# Altium PCB PCB_14layers_1mm73.PcbDoc (part 4 of 4)
Units mm, origin at the board's own origin, x right, y up, seen from the top; angles counter-clockwise.
Board outline 66 x 50 mm, 14 copper layers (Top Layer, Int1 (GND), Int2 (PWR), Int3 (Sign), GND, Int4 (Sign), Int5 (GND), Int6 (PWR), Int7 (Sign), GND2, Int8 (Sign), Int9 (PWR), Int10 (GND), Bottom Layer), stack 1.644 mm thick; 436 components, 541 nets, 2990 pads, 78 vias.
Unrouted connection lines stored in the file: 1647.
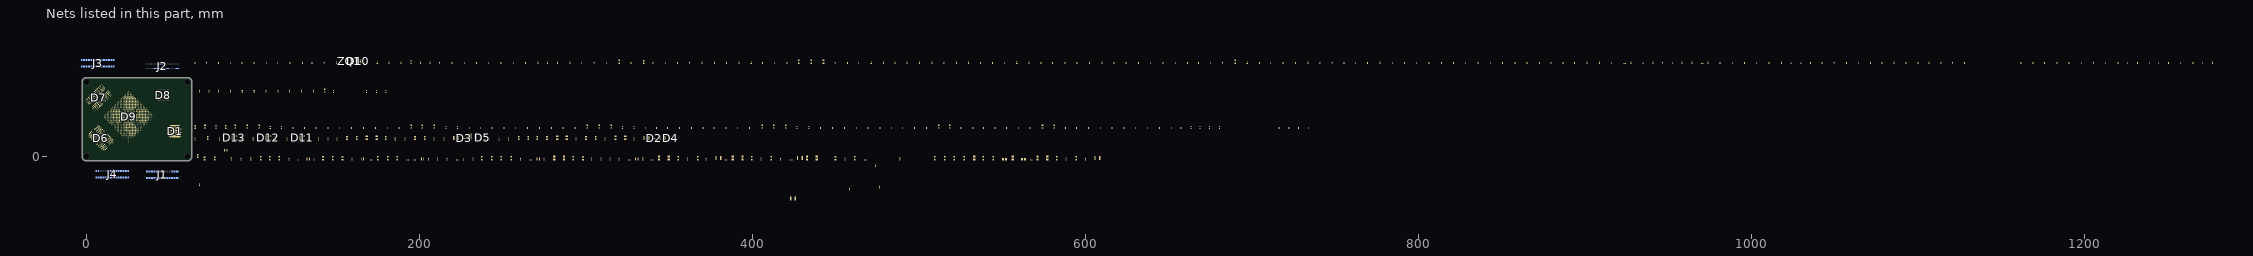
[diagram p15: the nets of this part, all layers, seen from the top]

## Via types
v1: diameter 0.6, hole 0.3, Top Layer to Bottom Layer, tented both sides, 48 vias
v2: diameter 0.45, hole 0.2, Top Layer to Bottom Layer, 30 vias

## Nets (pads, with @x,y where several pads share a name; then routed paths per layer and width w, separated by ;. In a path a pad name is that pad's centre, name@x,y a point inside that pad or via, vN(x,y) a via of type N, cw(c..) or ccw(c..) an arc to the next point about the centre after c; other vN are vias at no path point) (continued)
DDR_CH0_DM0_B: D6.Y3 D9.G4
DDR_CH0_DM0_C: D7.C3
DDR_CH0_DM0_D: D7.Y3
DDR_CH0_DM1_A: D6.C10 D9.AB4
DDR_CH0_DM1_B: D6.Y10 D9.E4
DDR_CH0_DM1_C: D7.C10
DDR_CH0_DM1_D: D7.Y10
DDR_CH0_DQ0_A: D6.B2 D9.U1
DDR_CH0_DQ0_B: D6.AA2 D9.H1
DDR_CH0_DQ0_C: D7.B2
DDR_CH0_DQ0_D: D7.AA2
DDR_CH0_DQ1_A: D6.C2 D9.T2
DDR_CH0_DQ1_B: D6.Y2 D9.J2
DDR_CH0_DQ1_C: D7.C2
DDR_CH0_DQ1_D: D7.Y2
DDR_CH0_DQ2_A: D6.E2 D9.T1
DDR_CH0_DQ2_B: D6.V2 D9.J1
DDR_CH0_DQ2_C: D7.E2
DDR_CH0_DQ2_D: D7.V2
DDR_CH0_DQ3_A: D6.F2 D9.R2
DDR_CH0_DQ3_B: D6.U2 D9.K2
DDR_CH0_DQ3_C: D7.F2
DDR_CH0_DQ3_D: D7.U2
DDR_CH0_DQ4_A: D6.F4 D9.W1
DDR_CH0_DQ4_B: D6.U4 D9.F1
DDR_CH0_DQ4_C: D7.F4
DDR_CH0_DQ4_D: D7.U4
DDR_CH0_DQ5_A: D6.E4 D9.V2
DDR_CH0_DQ5_B: D6.V4 D9.G2
DDR_CH0_DQ5_C: D7.E4
DDR_CH0_DQ5_D: D7.V4
DDR_CH0_DQ6_A: D6.C4 D9.V1
DDR_CH0_DQ6_B: D6.Y4 D9.G1
DDR_CH0_DQ6_C: D7.C4
DDR_CH0_DQ6_D: D7.Y4
DDR_CH0_DQ7_A: D6.B4 D9.U2
DDR_CH0_DQ7_B: D6.AA4 D9.H2
DDR_CH0_DQ7_C: D7.B4
DDR_CH0_DQ7_D: D7.AA4
DDR_CH0_DQ8_A: D6.B11 D9.AB2
DDR_CH0_DQ8_B: D6.AA11 D9.D2
DDR_CH0_DQ8_C: D7.B11
DDR_CH0_DQ8_D: D7.AA11
DDR_CH0_DQ9_A: D6.C11 D9.AB1
DDR_CH0_DQ9_B: D6.Y11 D9.C1
DDR_CH0_DQ9_C: D7.C11
DDR_CH0_DQ9_D: D7.Y11
DDR_CH0_DQ10_A: D6.E11 D9.AC1
DDR_CH0_DQ10_B: D6.V11 D9.C2
DDR_CH0_DQ10_C: D7.E11
DDR_CH0_DQ10_D: D7.V11
DDR_CH0_DQ11_A: D6.F11 D9.AC2
DDR_CH0_DQ11_B: D6.U11 D9.B1
DDR_CH0_DQ11_C: D7.F11
DDR_CH0_DQ11_D: D7.U11
DDR_CH0_DQ12_A: D6.F9 D9.Y1
DDR_CH0_DQ12_B: D6.U9 D9.F2
DDR_CH0_DQ12_C: D7.F9
DDR_CH0_DQ12_D: D7.U9
DDR_CH0_DQ13_A: D6.E9 D9.Y2
DDR_CH0_DQ13_B: D6.V9 D9.E1
DDR_CH0_DQ13_C: D7.E9
DDR_CH0_DQ13_D: D7.V9
DDR_CH0_DQ14_A: D6.C9 D9.AA1
DDR_CH0_DQ14_B: D6.Y9 D9.E2
DDR_CH0_DQ14_C: D7.C9
DDR_CH0_DQ14_D: D7.Y9
DDR_CH0_DQ15_A: D6.B9 D9.AA2
DDR_CH0_DQ15_B: D6.AA9 D9.D1
DDR_CH0_DQ15_C: D7.B9
DDR_CH0_DQ15_D: D7.AA9
DDR_CH0_DQS0A_N: D6.E3 D9.U4
DDR_CH0_DQS0A_P: D6.D3 D9.U5
DDR_CH0_DQS0B_N: D6.V3 D9.J7
DDR_CH0_DQS0B_P: D6.W3 D9.J8
DDR_CH0_DQS0C_N: D7.E3
DDR_CH0_DQS0C_P: D7.D3
DDR_CH0_DQS0D_N: D7.V3
DDR_CH0_DQS0D_P: D7.W3
DDR_CH0_DQS1A_N: D6.E10 D9.AA4
DDR_CH0_DQS1A_P: D6.D10 D9.AA5
DDR_CH0_DQS1B_N: D6.V10 D9.F4
DDR_CH0_DQS1B_P: D6.W10 D9.F5
DDR_CH0_DQS1C_N: D7.E10
DDR_CH0_DQS1C_P: D7.D10
DDR_CH0_DQS1D_N: D7.V10
DDR_CH0_DQS1D_P: D7.W10
DDR_CH0_LP4/4X_CKE0/LP5_CS0_A: D9.P7 R53.1
DDR_CH0_LP4/4X_CKE0/LP5_CS0_B: D9.L5 R55.1
DDR_CH0_LP4/4X_CKE0_A: D6.J4 R53.2
DDR_CH0_LP4/4X_CKE0_B: D6.P4 R55.2
DDR_CH0_LP4/4X_CKE1/LP5_CS1_A: D9.N7
DDR_CH0_LP4/4X_CKE1/LP5_CS1_B: D9.L4
DDR_CH0_LP4/4X_CS0_A: D6.H4 D9.R6
DDR_CH0_LP4/4X_CS0_B: D6.R4 D9.L7
DDR_CH0_LP4/4X_CS1_A: D9.R7
DDR_CH0_LP4/4X_CS1_B: D9.L8
DDR_CH1_A0_C: D9.G12
DDR_CH1_A0_D: D9.H15
DDR_CH1_A1_C: D9.F12
DDR_CH1_A1_D: D9.G14
DDR_CH1_A2_C: D9.E13
DDR_CH1_A2_D: D9.G13
DDR_CH1_A3_C: D9.D13
DDR_CH1_A3_D: D9.E14
DDR_CH1_A4_C: D9.A10
DDR_CH1_A4_D: D9.A15
DDR_CH1_A5_C: D9.B11
DDR_CH1_A5_D: D9.B14
DDR_CH1_CLKN_D: D9.A13
DDR_CH1_CLKP_D: D9.B13
DDR_CH1_DM0_C: D9.F8
DDR_CH1_DM0_D: D9.D20
DDR_CH1_DM1_C: D9.D4
DDR_CH1_DM1_D: D9.D22
DDR_CH1_DQ0_C: D9.A8
DDR_CH1_DQ0_D: D9.A17
DDR_CH1_DQ1_C: D9.B9
DDR_CH1_DQ1_D: D9.B16
DDR_CH1_DQ2_C: D9.A9
DDR_CH1_DQ2_D: D9.A16
DDR_CH1_DQ3_C: D9.B10
DDR_CH1_DQ3_D: D9.B15
DDR_CH1_DQ4_C: D9.A6
DDR_CH1_DQ4_D: D9.A19
DDR_CH1_DQ5_C: D9.B7
DDR_CH1_DQ5_D: D9.B18
DDR_CH1_DQ6_C: D9.A7
DDR_CH1_DQ6_D: D9.A18
DDR_CH1_DQ7_C: D9.B8
DDR_CH1_DQ7_D: D9.B17
DDR_CH1_DQ8_C: D9.A3
DDR_CH1_DQ8_D: D9.A22
DDR_CH1_DQ9_C: D9.B3
DDR_CH1_DQ9_D: D9.B22
DDR_CH1_DQ10_C: D9.A2
DDR_CH1_DQ10_D: D9.A23
DDR_CH1_DQ11_C: D9.B2
DDR_CH1_DQ11_D: D9.B23
DDR_CH1_DQ12_C: D9.A5
DDR_CH1_DQ12_D: D9.A20
DDR_CH1_DQ13_C: D9.B5
DDR_CH1_DQ13_D: D9.B20
DDR_CH1_DQ14_C: D9.A4
DDR_CH1_DQ14_D: D9.A21
DDR_CH1_DQ15_C: D9.B4
DDR_CH1_DQ15_D: D9.B21
DDR_CH1_DQS0N_C: D9.D9
DDR_CH1_DQS0N_D: D9.G16
DDR_CH1_DQS0P_C: D9.E9
DDR_CH1_DQS0P_D: D9.H16
DDR_CH1_DQS1N_C: D9.D5
DDR_CH1_DQS1N_D: D9.E21
DDR_CH1_DQS1P_C: D9.E5
DDR_CH1_DQS1P_D: D9.D21
DDR_CH1_LP4/4X_CKE0/LP5_CS0_C: D9.D11 R61.1
DDR_CH1_LP4/4X_CKE0/LP5_CS0_D: D9.D16 R63.1
DDR_CH1_LP4/4X_CKE0_C: D7.J4 R61.2
DDR_CH1_LP4/4X_CKE0_D: D7.P4 R63.2
DDR_CH1_LP4/4X_CKE1/LP5_CS1_C: D9.E11
DDR_CH1_LP4/4X_CKE1/LP5_CS1_D: D9.E16
DDR_CH1_LP4/4X_CS0_C: D7.H4 D9.G11
DDR_CH1_LP4/4X_CS0_D: D7.R4 D9.E19
DDR_CH1_LP4/4X_CS1_C: D9.H11
DDR_CH1_LP4/4X_CS1_D: D9.D19
DDR_RESET: C108.2 C159.2 D6.T11 D7.T11 D9.T4
eMMC_CLKOUT: C191.2 D8.M6 D9.V34
eMMC_CMD: D8.M5 D9.W34 R69.1
eMMC_D0: D8.A3 D9.Y33 R68.1
eMMC_D1: D8.A4 D9.W33
eMMC_D2: D8.A5 D9.V32
eMMC_D3: D8.B2 D9.AA33
eMMC_D4: D8.B3 D9.Y32
eMMC_D5: D8.B4 D9.AA32 D9.W32
eMMC_D6: D8.B5
eMMC_D7: D8.B6 D9.V33
eMMC_DATA_STROBE: D9.Y34 R72.2
eMMC_RSTn: C192.2 D8.K5 D9.AA34 R70.1
eMMC_VDDi: C190.2 D8.C2
FB6_RK806-1: C41.1 D1.31 R17.1 R18.2
FB9_RK806-1: C30.1 D1.66
GND: C1.1 C2.1 C3.1 C4.1 C5.1 C6.1 C7.1 C8.1 C9.1 C10.1 C11.1 C13.1 C14.1 C15.1 C16.1 C17.1 C18.1 C19.1 C20.1 C21.1 C22.1 C23.1 C24.1 C25.1 C26.1 C27.1 C28.1 C33.1 C34.1 C38.1 C39.1 C40.1 C42.1 C43.1 C44.1 C45.1 C46.1 C47.1 C48.1 C49.1 C50.1 C51.1 C52.1 C53.1 C54.1 C55.1 C56.1 C57.1 C58.1 C59.1 C60.1 C61.1 C62.1 C63.1 C64.1 C65.1 C66.1 C67.1 C68.1 C69.1 C70.1 C71.1 C72.1 C73.1 C74.1 C75.1 C76.1 C79.1 C80.1 C81.1 C82.1 C83.1 C85.1 C87.1 C88.1 C89.1 C90.1 C94.1 C95.1 C96.1 C97.1 C99.1 C101.1 C102.1 C103.1 C104.1 C105.1 C106.1 C107.1 C108.1 C109.1 C110.1 C111.1 C112.1 C113.1 C114.1 C115.1 C116.1 C117.1 C118.1 C119.1 C120.1 C121.1 C122.1 C123.1 C124.1 C125.1 C126.1 C127.1 C128.1 C129.1 C130.1 C131.1 C132.1 C133.1 C134.1 C135.1 C136.1 C137.1 C138.1 C139.1 C140.1 C141.1 C142.1 C143.1 C144.1 C145.1 C146.1 C147.1 C148.1 C149.1 C150.1 C151.1 C152.1 C153.1 C154.1 C155.1 C156.1 C157.1 C158.1 C159.1 C160.1 C161.1 C162.1 C163.1 C164.1 C165.1 C166.1 C167.1 C168.1 C169.1 C170.1 C171.1 C172.1 C173.1 C174.1 C175.1 C176.1 C177.1 C178.1 C179.1 C180.1 C181.1 C182.1 C183.1 C184.1 C185.1 C186.1 C187.1 C188.1 C189.1 C190.1 C191.1 C192.1 C193.1 C194.1 C195.1 C196.1 C197.1 C198.1 C199.1 C200.1 C201.1 C202.1 C203.1 C204.1 C205.1 C206.1 C207.1 C208.1 C209.1 C210.1 C211.1 C212.1 C214.1 C215.1 C217.1 C219.1 C220.1 C223.1 C225.1 C227.1 C228.1 C230.1 C232.1 C233.1 C234.1 C235.1 C236.1 C240.1 C241.1 C243.1 C244.1 C245.1 C246.1 C247.1 C248.1 C249.1 C250.1 C251.1 C252.1 C253.1 C254.1 C255.1 C256.1 C257.1 C258.1 C259.1 C260.1 C261.1 C262.1 C263.1 C264.1 C265.1 C266.1 C267.1 C268.1 C269.1 C270.1 C271.1 C272.1 C273.1 C274.1 C275.1 C276.1 C277.1 C278.1 C279.1 C280.1 C281.1 C282.1 C283.1 C284.1 C285.1 C286.1 C287.1 C288.1 C289.1 C290.1 C291.1 C292.1 C293.1 C294.1 C295.1 C296.1 C297.1 C303.1 C304.1 C305.1 C306.1 C307.1 C308.1 C309.1 C310.1 C311.1 C312.1 C313.1 C314.1 C316.1 C317.1 C318.1 C319.1 C320.1 C321.1 C322.1 C323.1 C324.1 C325.1 C326.1 C327.1 C328.1 C329.1 C330.1 C331.1 C332.1 C333.1 C334.1 C335.1 C336.1 C337.1 C338.1 C339.1 C340.1 C341.1 C342.1 C343.1 C344.1 C345.1 C346.1 C347.1 C348.1 C349.1 C350.1 C351.1 C352.1 C353.1 C354.1 C355.1 C356.1 C357.1 C358.1 C359.1 C?.1 D1.69 D2.B2 D2.B3 D2.B4 D2.C1 D2.C2 D2.C3 D2.C4 D3.B2 D3.B3 D3.B4 D3.C1 D3.C2 D3.C3 D3.C4 D4.B2 D4.B3 D4.B4 D4.C1 D4.C2 D4.C3 D4.C4 D5.2 D6.A3 D6.A10 D6.AB3 D6.AB5 D6.AB8 D6.AB10 D6.C1 D6.C5 D6.C8 D6.C12 D6.D2 D6.D4 D6.D9 D6.D11 D6.E1 D6.E5 D6.E8 D6.E12 D6.G1 D6.G3 D6.G5 D6.G8 D6.G10 D6.G12 D6.J1 D6.J3 D6.J10 D6.J12 D6.K2 D6.K4 D6.K9 D6.K11 D6.N2 D6.N4 D6.N9 D6.N11 D6.P1 D6.P3 D6.P10 D6.P12 D6.T1 D6.T3 D6.T5 D6.T8 D6.T10 D6.T12 D6.V1 D6.V5 D6.V8 D6.V12 D6.W2 D6.W4 D6.W9 D6.W11 D6.Y1 D6.Y5 D6.Y8 D6.Y12 D7.A3 D7.A10 D7.AB3 D7.AB5 D7.AB8 D7.AB10 D7.C1 D7.C5 D7.C8 D7.C12 D7.D2 D7.D4 D7.D9 D7.D11 D7.E1 D7.E5 D7.E8 D7.E12 D7.G1 D7.G3 D7.G5 D7.G8 D7.G10 D7.G12 D7.J1 D7.J3 D7.J10 D7.J12 D7.K2 D7.K4 D7.K9 D7.K11 D7.N2 D7.N4 D7.N9 D7.N11 D7.P1 D7.P3 D7.P10 D7.P12 D7.T1 D7.T3 D7.T5 D7.T8 D7.T10 D7.T12 D7.V1 D7.V5 D7.V8 D7.V12 D7.W2 D7.W4 D7.W9 D7.W11 D7.Y1 D7.Y5 D7.Y8 D7.Y12 D8.A6 D8.C4 D8.E7 D8.G5 D8.H10 D8.J5 D8.K8 D8.N2 D8.N5 D8.P4 D8.P6 D9.A1 D9.A11 D9.A14 D9.A34 D9.AA3 D9.AA6 D9.AA8 D9.AA10 D9.AA11 D9.AA16 D9.AA17 D9.AA18 D9.AA19 D9.AA20 D9.AA21 D9.AA22 D9.AA23 D9.AA24 D9.AA31 D9.AB3 D9.AB5 D9.AB6 D9.AB7 D9.AB8 D9.AB10 D9.AB11 D9.AB16 D9.AB17 D9.AB18 D9.AB19 D9.AB20 D9.AB24 D9.AB27 D9.AB29 D9.AB32 D9.AC3 D9.AC4 D9.AC5 D9.AC8 D9.AC10 D9.AC11 D9.AC12 D9.AC16 D9.AC20 D9.AC21 D9.AC24 D9.AC27 D9.AD5 D9.AD8 D9.AD10 D9.AD11 D9.AD12 D9.AD16 D9.AD20 D9.AD21 D9.AD24 D9.AD25 D9.AD26 D9.AE3 D9.AE6 D9.AE7 D9.AE9 D9.AE11 D9.AE12 D9.AE13 D9.AE14 D9.AE15 D9.AE16 D9.AE18 D9.AE19 D9.AE20 D9.AE21 D9.AE24 D9.AE26 D9.AF4 D9.AF7 D9.AF8 D9.AF11 D9.AF12 D9.AF13 D9.AF14 D9.AF15 D9.AF16 D9.AF21 D9.AF22 D9.AF24 D9.AF25 D9.AF27 D9.AF28 D9.AF29 D9.AF30 D9.AF31 D9.AF32 D9.AG3 D9.AG6 D9.AG7 D9.AG10 D9.AG12 D9.AG15 D9.AG18 D9.AG21 D9.AG22 D9.AG30 D9.AH4 D9.AH8 D9.AH11 D9.AH12 D9.AH15 D9.AH21 D9.AH22 D9.AH23 D9.AJ3 D9.AJ7 D9.AJ8 D9.AJ9 D9.AJ11 D9.AJ12 D9.AJ15 D9.AJ16 D9.AJ18 D9.AJ21 D9.AJ22 D9.AJ23 D9.AJ30 D9.AK4 D9.AK5 D9.AK7 D9.AK10 D9.AK11 D9.AK12 D9.AK13 D9.AK14 D9.AK23 D9.AK28 D9.AK29 D9.AL3 D9.AL4 D9.AL5 D9.AL11 D9.AL13 D9.AL23 D9.AL25 D9.AM4 D9.AM8 D9.AM9 D9.AM18 D9.AM20 D9.AM22 D9.AM23 D9.AM24 D9.AM26 D9.AM28 D9.AM30 D9.AN7 D9.AN12 D9.AN23 D9.AN31 D9.AP1 D9.AP17 D9.AP23 D9.AP34 D9.B6 D9.B19 D9.B24 D9.B27 D9.B33 D9.C3 D9.C4 D9.C5 D9.C6 D9.C7 D9.C8 D9.C9 D9.C10 D9.C11 D9.C12 D9.C13 D9.C14 D9.C15 D9.C16 D9.C17 D9.C18 D9.C20 D9.C21 D9.C22 D9.C23 D9.C26 D9.C28 D9.C30 D9.C32 D9.D3 D9.D23 D9.D24 D9.D31 D9.E3 D9.E6 D9.E8 D9.E12 D9.E18 D9.E20 D9.E22 D9.E23 D9.E32 D9.F3 D9.F7 D9.F9 D9.F10 D9.F11 D9.F13 D9.F14 D9.F15 D9.F16 D9.F19 D9.F20 D9.F21 D9.F22 D9.F23 D9.F31 D9.G3 D9.G6 D9.G10 D9.G15 D9.G19 D9.G21 D9.G22 D9.G25 D9.G32 D9.H3 D9.H6 D9.H10 D9.H12 D9.H14 D9.H19 D9.H22 D9.H25 D9.H26 D9.H28 D9.H31 D9.J3 D9.J4 D9.J5 D9.J6 D9.J10 D9.J11 D9.J12 D9.J13 D9.J14 D9.J15 D9.J16 D9.J18 D9.J19 D9.J20 D9.J21 D9.J22 D9.J23 D9.J24 D9.J25 D9.J27 D9.J28 D9.J29 D9.J32 D9.K3 D9.K6 D9.K8 D9.K9 D9.K18 D9.K21 D9.K22 D9.K26 D9.K31 D9.K32 D9.L1 D9.L3 D9.L6 D9.L9 D9.L16 D9.L19 D9.L20 D9.L21 D9.L22 D9.L25 D9.L26 D9.L31 D9.M3 D9.M6 D9.M9 D9.M11 D9.M14 D9.M15 D9.M18 D9.M20 D9.M22 D9.M25 D9.M26 D9.M29 D9.M32 D9.N3 D9.N6 D9.N9 D9.N11 D9.N14 D9.N15 D9.N18 D9.N20 D9.N22 D9.N25 D9.N26 D9.N29 D9.N32 D9.P1 D9.P3 D9.P6 D9.P8 D9.P9 D9.P11 D9.P14 D9.P15 D9.P18 D9.P19 D9.P20 D9.P21 D9.P22 D9.P25 D9.P26 D9.P34 D9.R3 D9.R5 D9.R8 D9.R9 D9.R11 D9.R13 D9.R15 D9.R18 D9.R19 D9.R20 D9.R21 D9.R22 D9.R23 D9.R24 D9.R25 D9.R26 D9.R28 D9.R33 D9.T3 D9.T6 D9.T9 D9.T11 D9.T13 D9.T15 D9.T18 D9.T19 D9.T20 D9.T23 D9.T24 D9.T25 D9.T26 D9.T27 D9.T33 D9.U3 D9.U12 D9.U13 D9.U15 D9.U16 D9.U17 D9.U19 D9.U20 D9.U23 D9.U24 D9.U30 D9.U31 D9.U34 D9.V3 D9.V4 D9.V5 D9.V8 D9.V9 D9.V10 D9.V11 D9.V15 D9.V18 D9.V19 D9.V23 D9.V24 D9.V25 D9.V27 D9.V30 D9.W2 D9.W3 D9.W6 D9.W7 D9.W9 D9.W10 D9.W11 D9.W12 D9.W15 D9.W16 D9.W17 D9.W18 D9.W19 D9.W20 D9.W23 D9.W24 D9.W27 D9.Y3 D9.Y5 D9.Y6 D9.Y8 D9.Y9 D9.Y10 D9.Y11 D9.Y12 D9.Y13 D9.Y14 D9.Y15 D9.Y16 D9.Y17 D9.Y18 D9.Y19 D9.Y20 D9.Y23 D9.Y24 D9.Y28 D10.2 D11.2 D12.2 D13.2 J1.1 J1.2 J1.3 J1.4 J1.5 J1.6 J1.7 J1.8 J1.44 J1.45 J1.60 J1.63 J2.17 J2.26 J2.39 J2.48 J2.57 J2.70 J2.79 J2.92 J3.1 J3.39 J3.65 J4.7 J4.8 J4.33 J4.34 J4.45 J4.48 R1.1 R2.2 R11.1 R12.2 R14.1 R18.1 R20.1 R36.1 R46.1 R71.1 R80.1 R86.1 R93.1 R94.1 R95.1 R96.2 R97.2 VD1.2 ZQ1.2 ZQ1.4
  other v2: 50.6,13 51.6,13 52.6,13 53.6,13 54.6,13 55.6,13 50.6,14 51.6,14 52.6,14 53.6,14 54.6,14 55.6,14 50.6,15 51.6,15 52.6,15 53.6,15 54.6,15 55.6,15 50.6,16 51.6,16 52.6,16 53.6,16 54.6,16 55.6,16 50.6,17 51.6,17 52.6,17 53.6,17 54.6,17 55.6,17
I2C0_SCL_M2: D2.A3 D3.A3 D4.A3
I2C0_SDA_M2: D9.W29 R84.1
INT_RK806-1: D1.19 D9.M30 R10.1
J1_pin_22_3V3: D9.AK25 J1.22
J1_pin_23_3V3: D9.AL24 J1.23
J1_pin_24_VCCIO5: D9.AH25
J1_pin_24_VCIO5: J1.24
J1_pin_25_3V3: D9.AK24 J1.25
J1_pin_26_VCCIO5: D9.AG26
J1_pin_26_VCIO5: J1.26
J1_pin_27_3V3: D9.AJ25 J1.27
J1_pin_28_VCCIO5: D9.AH26
J1_pin_28_VCIO5: J1.28
J1_pin_29_3V3: D9.AJ28 J1.29
J1_pin_30_3V3: D9.AL26 J1.30
J1_pin_31_1V8: J1.31
J1_pin_32_3V3: D9.AK30 J1.32
J1_pin_33_3V3: D9.AK8 D9.AL8 J1.33
J1_pin_34_3V3: D9.AL30 J1.34
J1_pin_35_1V8: J1.35
J1_pin_36_3V3: D9.AJ27 J1.36
J1_pin_37_3V3: D9.AL14 D9.AM14 J1.37
J1_pin_38_3V3: D9.AJ26 J1.38
J1_pin_39_VCCIO5: D9.AG25
J1_pin_39_VCIO5: J1.39
J1_pin_40_3V3: D9.AM29 J1.40
J1_pin_41_VCCIO5: D9.AG24
J1_pin_41_VCIO5: J1.41
J1_pin_42_3V3: D9.AK26 J1.42
J1_pin_43_VCCIO5: D9.AG23
J1_pin_43_VCIO5: J1.43
J1_pin_46_1V8: D9.P31 J1.46
J1_pin_48_VCCIO_SD_S0: D9.AD1
J1_pin_48_VCIO_SD_S0: J1.48
J1_pin_50_VCCIO_SD_S0: D9.AD2
J1_pin_50_VCIO_SD_S0: J1.50
J1_pin_52_VCCIO_SD_S0: D9.AE1
J1_pin_52_VCIO_SD_S0: J1.52
J1_pin_54_VCCIO_SD_S0: D9.AE2
J1_pin_54_VCIO_SD_S0: J1.54
J1_pin_56_VCCIO_SD_S0: D9.AF1
J1_pin_56_VCIO_SD_S0: J1.56
J1_pin_58_VCCIO_SD_S0: D9.AF2
J1_pin_58_VCIO_SD_S0: J1.58
J1_pin_62_3V3: D9.AM27 J1.62
J1_pin_64_3V3: D9.AL27 J1.64
J1_pin_65: D9.AK6 D9.AL6 J1.65
J1_pin_66: D9.AN8 J1.66
J1_pin_67: J1.67
J1_pin_68: D9.AP8 J1.68
J1_pin_69: D9.AL7 D9.AM7 J1.69
J1_pin_70: D9.AN9 J1.70
J1_pin_71: J1.71
J1_pin_72: D9.AP9 J1.72
J1_pin_73: D9.AK9 D9.AL9 J1.73
J1_pin_74: D9.AN10 J1.74
J1_pin_75: J1.75
J1_pin_76: D9.AP10 J1.76
J1_pin_77: D9.AL10 J1.77
J1_pin_78: D9.AN11 J1.78
J1_pin_79: D9.AM10 J1.79
J1_pin_80: D9.AP11 J1.80
J2_pin_28: D9.G33 J2.28
J2_pin_30: D9.G34 J2.30
J2_pin_32: D9.D32 J2.32
J2_pin_34: D9.D33 J2.34
J2_pin_36: D9.F32 J2.36
J2_pin_38: D9.F33 J2.38
J2_pin_40: D9.C33 J2.40
J2_pin_41: D9.AP16 J2.41
J2_pin_42: D9.C34 J2.42
J2_pin_43: D9.AN16 J2.43
J2_pin_44: D9.E34 J2.44
J2_pin_45: D9.AP15 J2.45
J2_pin_46: D9.E33 J2.46
J2_pin_47: D9.AN15 J2.47
J2_pin_49: D9.AP14 J2.49
J2_pin_50: D9.B32 J2.50
J2_pin_51: D9.AN14 J2.51
J2_pin_52: D9.A32 J2.52
J2_pin_53: D9.AP13 J2.53
J2_pin_54: D9.B30 J2.54
J2_pin_55: D9.AN13 J2.55
J2_pin_56: D9.A30 J2.56
J2_pin_58: D9.C31 J2.58
J2_pin_60: D9.B31 J2.60
J2_pin_62: D9.C29 J2.62
J2_pin_64: D9.B29 J2.64
J2_pin_66: D9.A28 J2.66
J2_pin_68: D9.B28 J2.68
J2_pin_94_1V8: D9.AM15 J2.94
J2_pin_96_1V8: D9.AL15 J2.96
J2_pin_98: D9.AL12 D9.AM12 J2.98
J2_pin_100: J2.100
J3_pin_2_3V3: D9.AL28 J3.2
J3_pin_3: D9.N33 J3.3
J3_pin_4_3V3: D9.AL29 J3.4
J3_pin_5: D9.N34 J3.5
J3_pin_6_1V8: D9.V31 J3.6
J3_pin_7: D9.M33 J3.7
J3_pin_8_1V8: D9.W31 J3.8
J3_pin_9: D9.M34 J3.9
J3_pin_10_1V8: D9.T31 J3.10
J3_pin_11: D9.L32 J3.11
J3_pin_12_1V8: D9.T28 J3.12
J3_pin_13: D9.L33 J3.13
J3_pin_14_1V8: D9.V28 J3.14
J3_pin_15: D9.K33 J3.15
J3_pin_16_1V8: D9.V29 J3.16
J3_pin_17: D9.K34 J3.17
J3_pin_18_1V8: D9.T29 J3.18
J3_pin_19: D9.J33 J3.19
J3_pin_20_VCCIO5: D9.Y29 J3.20
J3_pin_21: D9.J34 J3.21
J3_pin_22_VCCIO5: D9.AA27 J3.22
J3_pin_23: D9.H32 J3.23
J3_pin_24_1V8: D9.G29 J3.24
J3_pin_25: D9.H33 J3.25
J3_pin_26_1V8: D9.G27 J3.26
J3_pin_27: D9.J31 J3.27
J3_pin_28_1V8: J3.28
J3_pin_28_UART2_RX_M0_DEBUG: D9.R29
J3_pin_29: D9.J30 J3.29
J3_pin_30_1V8: J3.30
J3_pin_30_UART2_TX_M0_DEBUG: D9.P29
J3_pin_31: D9.H30 J3.31
J3_pin_32_VCCIO5: D9.Y27 J3.32
J3_pin_33: D9.H29 J3.33
J3_pin_34_1V8: D9.R30 J3.34
J3_pin_35: D9.G31 J3.35
J3_pin_36_1V8: D9.P30 J3.36
J3_pin_37: D9.G30 J3.37
J3_pin_38_1V8: D9.K29 J3.38
J3_pin_40_1V8: D9.L30 J3.40
J3_pin_41_1V8: D9.AB31 J3.41
J3_pin_42_1V8: D9.P33 J3.42
J3_pin_43_1V8: D9.F30 J3.43
J3_pin_44_1V8: D9.A27 J3.44
J3_pin_45_1V8: D9.E29 J3.45
J3_pin_46_1V8: D9.B26 J3.46
J3_pin_47_1V8: D9.E31 J3.47
J3_pin_48_1V8: D9.A26 J3.48
J3_pin_49_1V8: D9.D30 J3.49
J3_pin_50_1V8: D9.B25 J3.50
J3_pin_51_1V8: D9.D28 J3.51
J3_pin_52_1V8: D9.A25 J3.52
J3_pin_53_1V8: D9.D29 J3.53
J3_pin_54_1V8: D9.A24 J3.54
J3_pin_55_1V8: D9.E30 J3.55
J3_pin_56_1V8: D9.F28 J3.56
J3_pin_57_1V8: D9.E27 J3.57
J3_pin_58_1V8: D9.G26 J3.58
J3_pin_59_1V8: D9.E26 J3.59
J3_pin_60_1V8: D9.E28 J3.60
J3_pin_61_1V8: D9.F25 J3.61
J3_pin_62_1V8: D9.F27 J3.62
J3_pin_63_1V8: D9.F24 J3.63
J3_pin_64_1V8: D9.F26 J3.64
J3_pin_66_1V8: D9.C27 J3.66
J3_pin_67_VCCIO5: D9.AB28 J3.67
J3_pin_68_1V8: D9.D27 J3.68
J3_pin_69_1V8: D9.AB30 J3.69
J3_pin_70_1V8: D9.D26 J3.70
J3_pin_71_1V8: D9.AC30 J3.71
J3_pin_72_1V8: D9.E25 J3.72
J3_pin_73_1V8: D9.D25 J3.73
J3_pin_74_VCCIO5: D9.AE28 J3.74
J3_pin_75_1V8: D9.C25 J3.75
J3_pin_76_VCCIO5: D9.AJ24 J3.76
J3_pin_77_1V8: D9.C24 J3.77
J3_pin_78_VCCIO5: D9.AH24 J3.78
J3_pin_79_1V8: D9.E24 J3.79
J3_pin_80_VCCIO5: D10.6 J3.80 R93.2
J4_pin_10: D9.AM33 D9.AM34 J4.10
J4_pin_12: J4.12
J4_pin_14: D9.AL33 D9.AL34 J4.14
J4_pin_16: J4.16
J4_pin_18: D9.AK33 D9.AK34 J4.18
J4_pin_20: J4.20
J4_pin_22: D9.AJ33 D9.AJ34 J4.22
J4_pin_24: J4.24
J4_pin_26: D9.AH33 D9.AH34 J4.26
J4_pin_28: J4.28
J4_pin_30: D9.AG33 D9.AG34 J4.30
J4_pin_32: J4.32
J4_pin_35_1V8: D9.AN17 J4.35
J4_pin_37_1V8: D9.AM16 J4.37
J4_pin_38_1V8: D9.U33 J4.38
J4_pin_39_1V8: D9.AL16 J4.39
J4_pin_40_1V8: D9.AF33 J4.40
J4_pin_41_1V8: D9.AK17 J4.41
J4_pin_42_1V8: C274.2 D9.M31 R90.1 R92.1
J4_pin_43_3V3: D9.AK27 J4.43
J4_pin_46_3V3: D9.AM25 J4.46
J4_pin_47_1V8: D9.AE33 J4.47
J4_pin_49_1V8: D9.AE34 J4.49
J4_pin_50_1V8: D9.AD30 J4.50
J4_pin_51_1V8: D9.AD33 J4.51
J4_pin_52_1V8: D9.AE31 J4.52
J4_pin_53_1V8: D9.AD34 J4.53
J4_pin_54_1V8: D9.AE32 J4.54
J4_pin_55_1V8: D9.AC33 J4.55
J4_pin_56_1V8: D9.AD31 J4.56
J4_pin_57_1V8: D9.AC34 J4.57
J4_pin_58_1V8: D9.AD32 J4.58
J4_pin_59_VCCIO5: D9.AH30 J4.59
J4_pin_60_1V8: D9.AC31 J4.60
J4_pin_61_VCCIO5: D9.AH29 J4.61
J4_pin_62_1V8: D9.AC32 J4.62
J4_pin_63_VCCIO5: D9.AG29 J4.63
J4_pin_64_1V8: D9.AF34 J4.64
J4_pin_65_VCCIO5: D9.AG28 J4.65
J4_pin_66_VCCIO5: D9.AH27 J4.66
J4_pin_67_VCCIO5: D9.AE27 J4.67
J4_pin_68_1V8: D9.AB33 J4.68
J4_pin_69_VCCIO5: D9.AD27 J4.69
J4_pin_70_1V8: D9.AB34 J4.70
J4_pin_71_VCCIO5: D9.AD28 J4.71
J4_pin_72_VCCIO5: D9.AE29 J4.72
J4_pin_73_VCCIO5: D9.AC28 J4.73
J4_pin_74_VCCIO5: D9.AD29 J4.74
J4_pin_75_VCCIO5: D9.AC29 J4.75
J4_pin_76_VCCIO5: D9.Y31 J4.76
J4_pin_77_VCCIO5: D9.AA30 J4.77
J4_pin_78_VCCIO5: D9.Y30 J4.78
J4_pin_79_VCCIO5: D9.AA29 J4.79
J4_pin_80_VCCIO5: D9.AA28 J4.80
MISO_RK806-1: D1.16 R78.2 R79.2 R80.2
NetC90_2: C90.2 D5.1 R41.2
NetC92_1: C92.1 D5.5 R45.1 R46.2
NetC193_2: C193.2 R74.1 ZQ1.1
NetC357_2: C357.2 D13.4
NetD2_D3: D2.D3 D2.D4 D2.E3 D2.E4 L11.1
NetD3_D3: D3.D3 D3.D4 D3.E3 D3.E4 L12.1
NetD4_D3: D4.D3 D4.D4 D4.E3 D4.E4 L14.1
NetD5_3: D5.3 L15.1
NetD6_A5: D6.A5 R49.2
NetD6_G2: D6.G2 R50.2
NetD6_T2: D6.T2 R51.2
NetD7_A5: D7.A5 R57.2
NetD7_G2: D7.G2 R58.2
NetD7_T2: D7.T2 R59.2
NetD8_H5: D8.H5 R71.2 R72.1
NetD9_A33: D9.A33 R2.1
NetD9_AG9: D9.AG9 R94.2
NetD9_AG16: D9.AG16 R97.1
NetD9_AH9: D9.AH9 R96.1
NetD9_AH16: D9.AH16 R95.2
NetD9_B34: D9.B34 R1.2
NetD9_F18: D9.F18 R82.1
NetD9_G8: D9.G8 R81.2
NetD9_H7: D9.H7 R76.1
NetD9_W8: D9.W8 R73.2
NPOR: C?.2 D1.40 J4.42 R9.1 R92.2
PMIC_EXT_EN_OUT: J4.36 R41.1
PMIC_PWR_CTRL1: D9.R32
PMIC_PWR_CTRL2: R85.2 R86.2
PMIC_SPI_CLK: D9.N31
PMIC_SPI_MOSI: D1.15 R12.1 R77.2 R91.1
PWRCRTL1_RK806-1: D1.62
PWRCRTL2_RK806-1: D1.61
PWRON_L: D1.4 J4.44
SPI2_CS0_M2: D9.K30 R87.1
SPI2_MISO_M2: D9.L29 R77.1 R79.1
SPI2_MOSI_M2: D9.N30 R91.2
SW1_RK806-1: D1.50 D1.51 L1.1
SW2_RK806-1: D1.35 D1.36 L6.1
SW3_RK806-1: D1.55 L7.1
SW4_RK806-1: D1.23 L8.1
SW5_RK806-1: D1.45 L2.1
SW6_RK806-1: D1.29 L5.1
SW7_RK806-1: D1.42 L9.1
SW8_RK806-1: D1.6 L10.1
SW9_RK806-1: D1.68 L3.1
SW10_RK806-1: D1.26 L4.1
TSADC_SHUT_H: D9.P32 R90.2
VCC4V0_SYS: C10.2 C15.2 C19.2 C20.2 C21.2 C22.2 C23.2 C24.2 C25.2 C26.2 C27.2 C28.2 C73.2 C74.2 C75.2 C76.2 C87.2 C88.2 C89.2 C353.2 C355.2 C356.2 D1.1 D1.7 D1.21 D1.22 D1.27 D1.28 D1.33 D1.34 D1.43 D1.44 D1.52 D1.53 D1.64 D2.D1 D2.D2 D2.E1 D2.E2 D3.D1 D3.D2 D3.E1 D3.E2 D4.D1 D4.D2 D4.E1 D4.E2 D5.4 D11.1 D11.3 D12.1 D12.3 D13.1 D13.3 J1.9 J1.10 J1.11 J1.12 J1.13 J1.14 J1.15 J1.16 J1.17 J1.18 J1.19 J1.20 VD1.1
VCC_1V1_NLDO: C14.2 C18.2 C92.2 C95.2 C97.2 C99.2 D1.9 D1.13 L15.2 R45.2
VCC_1V8_S3: J4.1 J4.3
VCC_2V0_NLDO: C13.2 D1.59
VCC_3V3_S3: J4.2 J4.4
VCCA1V2_IMAGE: C7.2 D1.57
VCCA1V8_IMAGE_P: C8.2 C310.2 C311.2 C312.2 C313.2 C314.2 C336.2 C337.2 D1.58 D9.AA26 D9.AB26 D9.AC6 D9.AC7 D9.AD6 D9.AD7
VCCA_1V8_P: C9.2 C194.2 C195.2 C209.2 C228.2 C303.2 C323.2 C324.2 C330.2 C331.2 C342.2 C343.2 C344.2 C349.2 D1.60 D9.AG11 D9.AG13 D9.AG14 D9.AH18 D9.G23 D9.H23 D9.K16 D9.K27 D9.L27 D9.M12 D9.M27 D9.N27 D9.U18
VCCA_1V8_S3: C359.2 D13.5
VCCA_3V3_P: C6.2 D1.63
VCCA_3V3_S0: C354.2 D11.5 J1.21
VCCA_3V3_S3: C358.2 D12.5
VCCIO5: C309.2 D9.W26 D10.4
VCCIO_SD_P: C11.2 C17.2 D1.20 D1.65
VDC_EXT: C16.2 D1.32 J4.6 R13.1 R14.2
VDD1_1V8_DDR: C101.2 C104.2 C107.2 C111.2 C114.2 C117.2 C120.2 C123.2 C126.2 C154.2 C157.2 C161.2 C164.2 C167.2 C170.2 C173.2 C176.2 C179.2 D6.F1 D6.F12 D6.G4 D6.G9 D6.T4 D6.T9 D6.U1 D6.U12 D7.F1 D7.F12 D7.G4 D7.G9 D7.T4 D7.T9 D7.U1 D7.U12 R67.1
VDD2_DDR_CKE: C217.2 C263.2 D9.H13 D9.N8 R88.1
VDD2_DRR: R50.1 R51.1 R58.1 R59.1
VDD_CPU_BIG0: C77.1 C77.2 C79.2 C81.2 C83.2 C85.2 C244.2 C251.2 C257.2 C265.2 C271.2 C275.2 C279.2 D2.A4 D9.M16 D9.M17 D9.M19 D9.N16 D9.N17 D9.N19 D9.P16 D9.P17 D9.R16 D9.R17 D9.T16 D9.T17 L11.2 R37.1 R37.2
VDD_CPU_BIG1: C93.1 C93.2 C94.2 C96.2 C243.2 C250.2 C258.2 C266.2 C272.2 C289.2 C292.2 D4.A4 D9.K23 D9.K24 D9.L23 D9.L24 D9.M21 D9.M23 D9.M24 D9.N21 D9.N23 D9.N24 D9.P23 D9.P24 L14.2 R42.1 R42.2
VDD_CPU_LIT: C35.1 C35.2 C45.2 C54.2 C63.2 C69.2 C225.2 C235.2 C249.2 C256.2 C264.2 C270.2 C295.2 C297.2 D1.37 D9.T21 D9.T22 D9.U21 D9.U22 D9.V21 D9.V22 D9.W21 D9.W22 D9.Y21 D9.Y22 L6.2 R22.1 R22.2
VDD_DDR: C31.1 C31.2 C42.2 C49.2 C61.2 C68.2 C206.2 C208.2 C212.2 C215.2 C220.2 C230.2 C234.2 C241.2 C247.2 C254.2 D1.46 D9.L11 D9.L12 D9.L13 D9.L14 D9.L17 D9.L18 D9.N13 D9.P12 D9.P13 D9.R12 D9.T12 D9.U11 L2.2 R16.1 R16.2
VDD_GPU: C29.1 C29.2 C33.2 C39.2 C50.2 C58.2 C277.2 C281.2 C284.2 C286.2 C287.2 C291.2 C293.2 D1.49 D9.AA12 D9.AA13 D9.AA14 D9.AA15 D9.AB12 D9.AB13 D9.AB14 D9.AB15 D9.AC13 D9.AC14 D9.AC15 D9.AD13 D9.AD14 D9.AD15 L1.2 R15.1 R15.2
VDD_LOGIC: C36.1 C36.2 C46.2 C55.2 C64.2 C70.2 C278.2 C282.2 C285.2 C288.2 C290.2 C294.2 C296.2 D1.56 D9.AC17 D9.AC18 D9.AC19 D9.AD17 D9.AD18 D9.AD19 D9.K19 D9.K20 D9.V16 D9.V17 L7.2 R23.1 R23.2
VDD_NPU: C78.1 C78.2 C80.2 C82.2 C248.2 C255.2 C261.2 C268.2 C283.2 D3.A4 D9.AB21 D9.AB22 D9.AB23 D9.AC22 D9.AC23 D9.AD22 D9.AD23 D9.AE22 D9.AE23 L12.2 R38.1 R38.2
VDD_VDENC: C37.1 C37.2 C47.2 C56.2 C65.2 C71.2 C232.2 C245.2 C252.2 C259.2 C267.2 C269.2 C276.2 C280.2 D1.24 D9.R14 D9.T14 D9.U14 D9.V12 D9.V13 D9.V14 D9.W13 D9.W14 L8.2 R24.1 R24.2
VDDA0V75_IMAGE_P: C3.2 C316.2 C317.2 C318.2 C319.2 C320.2 D1.11 D9.AA9 D9.AB9 D9.AC9 D9.AD9
VDDA0V75_PMU_P: D1.14
VDDA_0V75_P: C1.2 C338.2 C339.2 C341.2 C351.2 D1.8 D9.AA25 D9.AB25 D9.AD3 D9.AH10 D9.V20
VDDA_0V75_PMU_P: C5.2 C196.2 C198.2 C200.2 C201.2 D9.P27
VDDA_0V85_P: C2.2 C321.2 C322.2 C326.2 C327.2 C328.2 C332.2 C345.2 C346.2 C347.2 C350.2 D1.10 D9.AH13 D9.AH14 D9.AJ13 D9.AJ14 D9.G24 D9.H24 D9.K28 D9.L28 D9.M28
VDDA_DDR_PLL_P: C4.2 C211.2 C236.2 D1.12 D9.L15 D9.N12
VDDQ_DDR: C30.2 C32.1 C32.2 C51.2 C59.2 C67.2 C205.2 C207.2 C210.2 C214.2 C219.2 C223.2 C227.2 C233.2 C240.2 C246.2 C253.2 C260.2 D1.67 D9.K11 D9.K12 D9.K13 D9.K14 D9.K15 D9.M10 D9.N10 D9.P10 D9.R10 D9.T10 L3.2 R19.1 R19.2 R20.2 R65.2 R73.1 R76.2 R81.1 R82.2 R89.2
VDDQ_DDR_CK: C204.2 C262.2 C273.2 D9.L10 D9.M13 R89.1
VDDQ_DRAM: C103.2 C106.2 C110.2 C113.2 C116.2 C119.2 C122.2 C125.2 C128.2 C130.2 C132.2 C134.2 C136.2 C138.2 C140.2 C141.2 C143.2 C145.2 C147.2 C149.2 C151.2 C153.2 C156.2 C160.2 C163.2 C166.2 C169.2 C172.2 C175.2 C178.2 D6.AA3 D6.AA5 D6.AA8 D6.AA10 D6.B3 D6.B5 D6.B8 D6.B10 D6.D1 D6.D5 D6.D8 D6.D12 D6.F3 D6.F10 D6.U3 D6.U10 D6.W1 D6.W5 D6.W8 D6.W12 D7.AA3 D7.AA5 D7.AA8 D7.AA10 D7.B3 D7.B5 D7.B8 D7.B10 D7.D1 D7.D5 D7.D8 D7.D12 D7.F3 D7.F10 D7.U3 D7.U10 D7.W1 D7.W5 D7.W8 D7.W12 R49.1 R57.1 R65.1 R66.1
VOUT6_RK806-1: C41.2 C48.2 C57.2 C62.2 C72.2 C102.2 C105.2 C109.2 C112.2 C115.2 C118.2 C121.2 C124.2 C127.2 C129.2 C131.2 C133.2 C135.2 C137.2 C139.2 C142.2 C144.2 C146.2 C148.2 C150.2 C152.2 C155.2 C158.2 C162.2 C165.2 C168.2 C171.2 C174.2 C177.2 C180.2 D1.30 D6.A4 D6.A9 D6.AB4 D6.AB9 D6.F5 D6.F8 D6.H1 D6.H5 D6.H8 D6.H12 D6.K1 D6.K3 D6.K10 D6.K12 D6.N1 D6.N3 D6.N10 D6.N12 D6.R1 D6.R5 D6.R8 D6.R12 D6.U5 D6.U8 D7.A4 D7.A9 D7.AB4 D7.AB9 D7.F5 D7.F8 D7.H1 D7.H5 D7.H8 D7.H12 D7.K1 D7.K3 D7.K10 D7.K12 D7.N1 D7.N3 D7.N10 D7.N12 D7.R1 D7.R5 D7.R8 D7.R12 D7.U5 D7.U8 L5.2 R17.2 R66.2 R88.2
VOUT7_RK806-1: C38.2 C43.2 C60.2 D1.41 L9.2
VOUT8_RK806-1: C44.2 C53.2 C66.2 C184.2 C186.2 C188.2 C306.2 C329.2 C340.2 D1.5 D8.E6 D8.F5 D8.J10 D8.K9 D9.AC26 D9.AJ10 D9.Y7 D10.1 D10.5 L10.2 R35.1
VOUT10_RK806-1: C34.2 C40.2 C52.2 C181.2 C182.2 C183.2 C185.2 C187.2 C189.2 C199.2 C202.2 C203.2 C304.2 C305.2 C307.2 C308.2 C325.2 C333.2 C334.2 C335.2 C348.2 C352.2 D1.25 D8.C6 D8.M4 D8.N4 D8.P3 D8.P5 D9.AA7 D9.AC25 D9.G20 D9.H20 D9.H21 D9.N28 D9.P28 D9.R27 D9.V26 D9.W25 D9.Y26 D10.3 L4.2 R9.2 R10.2 R67.2 R68.2 R69.2 R70.2 R83.2 R84.2
VSEL2: D2.A1 D9.R31
VSEL3: D3.A1 D4.A1 D9.U32
VSEL4: D9.T32 R78.1
VSEL5: D9.T30 R85.1
VSEL6: D9.W28
XIN24M: C197.2 D9.R34 R75.1 ZQ1.3
XOUT24M: D9.T34 R74.2 R75.2
pads on no net: D1.2 D1.3 D1.38 D1.39 D1.47 D1.48 D1.54 D2.B1 D3.B1 D4.B1 D6.A1 D6.A2 D6.A8 D6.A11 D6.A12 D6.AA1 D6.AA12 D6.AB1 D6.AB2 D6.AB11 D6.AB12 D6.B1 D6.B12 D6.G11 D6.H3 D6.J5 D6.K5 D6.K8 D6.N5 D6.N8 D6.P5 D6.R3 D7.A1 D7.A2 D7.A8 D7.A11 D7.A12 D7.AA1 D7.AA12 D7.AB1 D7.AB2 D7.AB11 D7.AB12 D7.B1 D7.B12 D7.G11 D7.H3 D7.J5 D7.K5 D7.K8 D7.N5 D7.N8 D7.P5 D7.R3 D8.A1 D8.A2 D8.A7 D8.A8 D8.A9 D8.A10 D8.A11 D8.A12 D8.A13 D8.A14 D8.B1 D8.B7 D8.B8 D8.B9 D8.B10 D8.B11 D8.B12 D8.B13 D8.B14 D8.C1 D8.C3 D8.C5 D8.C7 D8.C8 D8.C9 D8.C10 D8.C11 D8.C12 D8.C13 D8.C14 D8.D1 D8.D2 D8.D3 D8.D4 D8.D12 D8.D13 D8.D14 D8.E1 D8.E2 D8.E3 D8.E5 D8.E8 D8.E9 D8.E10 D8.E12 D8.E13 D8.E14 D8.F1 D8.F2 D8.F3 D8.F10 D8.F12 D8.F13 D8.F14 D8.G1 D8.G2 D8.G3 D8.G10 D8.G12 D8.G13 D8.G14 D8.H1 D8.H2 D8.H3 D8.H12 D8.H13 D8.H14 D8.J1 D8.J2 D8.J3 D8.J12 D8.J13 D8.J14 D8.K1 D8.K2 D8.K3 D8.K6 D8.K7 D8.K10 D8.K12 D8.K13 D8.K14 D8.L1 D8.L2 D8.L3 D8.L12 D8.L13 D8.L14 D8.M1 D8.M2 D8.M3 D8.M7 D8.M8 D8.M9 D8.M10 D8.M11 D8.M12 D8.M13 D8.M14 D8.N1 D8.N3 D8.N6 D8.N7 D8.N8 D8.N9 D8.N10 D8.N11 D8.N12 D8.N13 D8.N14 D8.P1 D8.P2 D8.P7 D8.P8 D8.P9 D8.P10 D8.P11 D8.P12 D8.P13 D8.P14 D9.AD4 D9.AE4 D9.AE5 D9.AE8 D9.AE30 D9.AF3 D9.AF5 D9.AF6 D9.AF18 D9.AF19 D9.AF20 D9.AG1 D9.AG2 D9.AG4 D9.AG5 D9.AG19 D9.AG20 D9.AG31 D9.AG32 D9.AH2 D9.AH3 D9.AH5 D9.AH6 D9.AH19 D9.AH20 D9.AH31 D9.AH32 D9.AJ1 D9.AJ2 D9.AJ4 D9.AJ5 D9.AJ19 D9.AJ20 D9.AJ31 D9.AJ32 D9.AK2 D9.AK3 D9.AK15 D9.AK16 D9.AK18 D9.AK19 D9.AK20 D9.AK21 D9.AK22 D9.AK31 D9.AK32 D9.AL1 D9.AL2 D9.AL17 D9.AL18 D9.AL19 D9.AL20 D9.AL21 D9.AL22 D9.AL31 D9.AL32 D9.AM2 D9.AM3 D9.AM5 D9.AM17 D9.AM31 D9.AM32 D9.AN1 D9.AN2 D9.AN3 D9.AN4 D9.AN5 D9.AN6 D9.AN18 D9.AN19 D9.AN20 D9.AN21 D9.AN22 D9.AN24 D9.AN25 D9.AN26 D9.AN27 D9.AN28 D9.AN29 D9.AN30 D9.AN32 D9.AN33 D9.AN34 D9.AP2 D9.AP4 D9.AP6 D9.AP7 D9.AP12 D9.AP18 D9.AP19 D9.AP20 D9.AP21 D9.AP22 D9.AP24 D9.AP25 D9.AP26 D9.AP27 D9.AP28 D9.AP29 D9.AP30 D9.AP31 D9.AP32 D9.AP33 D9.C19 D9.D7 D9.D10 D9.D14 D9.D17 D9.E7 D9.E10 D9.E17 D9.G9 D9.G18 D9.H4 D9.H5 D9.H9 D9.H18 D9.K4 D9.K5 D9.K7 D9.M7 D9.T5 D9.V6 D9.V7 D9.W4 D9.W5 D9.W30 D11.4 D12.4 J1.0 J1.47 J1.49 J1.51 J1.53 J1.55 J1.57 J1.59 J1.61 J2.0 J2.1 J2.2 J2.3 J2.4 J2.5 J2.6 J2.7 J2.8 J2.9 J2.10 J2.11 J2.12 J2.13 J2.14 J2.15 J2.16 J2.18 J2.19 J2.20 J2.21 J2.22 J2.23 J2.24 J2.25 J2.27 J2.29 J2.31 J2.33 J2.35 J2.37 J2.59 J2.61 J2.63 J2.65 J2.67 J2.69 J2.71 J2.72 J2.73 J2.74 J2.75 J2.76 J2.77 J2.78 J2.80 J2.81 J2.82 J2.83 J2.84 J2.85 J2.86 J2.87 J2.88 J2.89 J2.90 J2.91 J2.93 J2.95 J2.97 J2.99 J3.0 J4.0 J4.9 J4.11 J4.13 J4.15 J4.17 J4.19 J4.21 J4.23 J4.25 J4.27 J4.29 J4.31 R83.1
copper on no net:
  other v1: 0,-2.325 60.5,-2.325 -1.162,-2.014 1.162,-2.014 59.338,-2.014 61.663,-2.014 -2.014,-1.162 2.014,-1.162 58.486,-1.165 62.514,-1.162 -2.325,0 2.325,0 58.175,0 62.825,0 -2.014,1.162 2.014,1.162 58.486,1.162 62.514,1.162 -1.165,2.014 1.162,2.014 59.338,2.014 61.663,2.014 0,2.325 60.5,2.325 0,42.175 60.5,42.175 -1.162,42.486 1.162,42.486 59.338,42.486 61.665,42.486 -2.014,43.338 2.014,43.338 58.486,43.338 62.514,43.338 -2.325,44.5 2.325,44.5 58.175,44.5 62.825,44.5 -2.014,45.662 2.014,45.665 58.486,45.662 62.514,45.662 -1.162,46.514 1.162,46.514 59.338,46.514 61.663,46.514 0,46.825 60.5,46.825

## Polygon pours and split planes (outlines as drawn)
no net on Int1 (GND) (split plane): 60.681,46.761 60.754,46.757 60.937,46.733 61.118,46.693 61.294,46.638 61.465,46.567 61.629,46.481 61.785,46.382 61.931,46.27 62.068,46.145 62.193,46.008 62.305,45.862 62.404,45.706 62.49,45.542 62.561,45.371 62.616,45.195 62.656,45.014 62.68,44.831 62.688,44.646 62.684,44.545 62.686,44.545 62.684,44.521 62.684,0.021 62.686,-0.003 62.684,-0.003 62.688,-0.104 62.68,-0.289 62.656,-0.472 62.616,-0.653 62.561,-0.829 62.49,-1 62.404,-1.164 62.305,-1.32 62.193,-1.466 62.068,-1.603 61.931,-1.728 61.785,-1.84 61.629,-1.94 61.465,-2.025 61.294,-2.096 61.118,-2.151 60.937,-2.191 60.754,-2.215 60.681,-2.219 -0.293,-2.219 -0.366,-2.215 -0.549,-2.191 -0.73,-2.151 -0.906,-2.096 -1.077,-2.025 -1.241,-1.939 -1.397,-1.84 -1.543,-1.728 -1.68,-1.603 -1.805,-1.466 -1.917,-1.32 -2.017,-1.164 -2.102,-1 -2.173,-0.829 -2.228,-0.653 -2.268,-0.472 -2.292,-0.289 -2.3,-0.104 -2.296,-0.003 -2.298,-0.003 -2.296,0.021 -2.296,44.521 -2.298,44.545 -2.296,44.545 -2.3,44.646 -2.292,44.831 -2.268,45.014 -2.228,45.195 -2.173,45.371 -2.102,45.542 -2.016,45.706 -1.917,45.862 -1.805,46.008 -1.68,46.145 -1.543,46.27 -1.397,46.382 -1.241,46.481 -1.077,46.567 -0.906,46.638 -0.73,46.693 -0.549,46.733 -0.366,46.757 -0.293,46.761
no net on Int2 (PWR) (split plane): 60.681,46.761 60.754,46.757 60.937,46.733 61.118,46.693 61.294,46.638 61.465,46.567 61.629,46.481 61.785,46.382 61.931,46.27 62.068,46.145 62.193,46.008 62.305,45.862 62.404,45.706 62.49,45.542 62.561,45.371 62.616,45.195 62.656,45.014 62.68,44.831 62.688,44.646 62.684,44.545 62.686,44.545 62.684,44.521 62.684,0.021 62.686,-0.003 62.684,-0.003 62.688,-0.104 62.68,-0.289 62.656,-0.472 62.616,-0.653 62.561,-0.829 62.49,-1 62.404,-1.164 62.305,-1.32 62.193,-1.466 62.068,-1.603 61.931,-1.728 61.785,-1.84 61.629,-1.94 61.465,-2.025 61.294,-2.096 61.118,-2.151 60.937,-2.191 60.754,-2.215 60.681,-2.219 -0.293,-2.219 -0.366,-2.215 -0.549,-2.191 -0.73,-2.151 -0.906,-2.096 -1.077,-2.025 -1.241,-1.939 -1.397,-1.84 -1.543,-1.728 -1.68,-1.603 -1.805,-1.466 -1.917,-1.32 -2.017,-1.164 -2.102,-1 -2.173,-0.829 -2.228,-0.653 -2.268,-0.472 -2.292,-0.289 -2.3,-0.104 -2.296,-0.003 -2.298,-0.003 -2.296,0.021 -2.296,44.521 -2.298,44.545 -2.296,44.545 -2.3,44.646 -2.292,44.831 -2.268,45.014 -2.228,45.195 -2.173,45.371 -2.102,45.542 -2.016,45.706 -1.917,45.862 -1.805,46.008 -1.68,46.145 -1.543,46.27 -1.397,46.382 -1.241,46.481 -1.077,46.567 -0.906,46.638 -0.73,46.693 -0.549,46.733 -0.366,46.757 -0.293,46.761
no net on GND (split plane): 60.681,46.761 60.754,46.757 60.937,46.733 61.118,46.693 61.294,46.638 61.465,46.567 61.629,46.481 61.785,46.382 61.931,46.27 62.068,46.145 62.193,46.008 62.305,45.862 62.404,45.706 62.49,45.542 62.561,45.371 62.616,45.195 62.656,45.014 62.68,44.831 62.688,44.646 62.684,44.545 62.686,44.545 62.684,44.521 62.684,0.021 62.686,-0.003 62.684,-0.003 62.688,-0.104 62.68,-0.289 62.656,-0.472 62.616,-0.653 62.561,-0.829 62.49,-1 62.404,-1.164 62.305,-1.32 62.193,-1.466 62.068,-1.603 61.931,-1.728 61.785,-1.84 61.629,-1.94 61.465,-2.025 61.294,-2.096 61.118,-2.151 60.937,-2.191 60.754,-2.215 60.681,-2.219 -0.293,-2.219 -0.366,-2.215 -0.549,-2.191 -0.73,-2.151 -0.906,-2.096 -1.077,-2.025 -1.241,-1.939 -1.397,-1.84 -1.543,-1.728 -1.68,-1.603 -1.805,-1.466 -1.917,-1.32 -2.017,-1.164 -2.102,-1 -2.173,-0.829 -2.228,-0.653 -2.268,-0.472 -2.292,-0.289 -2.3,-0.104 -2.296,-0.003 -2.298,-0.003 -2.296,0.021 -2.296,44.521 -2.298,44.545 -2.296,44.545 -2.3,44.646 -2.292,44.831 -2.268,45.014 -2.228,45.195 -2.173,45.371 -2.102,45.542 -2.016,45.706 -1.917,45.862 -1.805,46.008 -1.68,46.145 -1.543,46.27 -1.397,46.382 -1.241,46.481 -1.077,46.567 -0.906,46.638 -0.73,46.693 -0.549,46.733 -0.366,46.757 -0.293,46.761
no net on Int5 (GND) (split plane): 60.681,46.761 60.754,46.757 60.937,46.733 61.118,46.693 61.294,46.638 61.465,46.567 61.629,46.481 61.785,46.382 61.931,46.27 62.068,46.145 62.193,46.008 62.305,45.862 62.404,45.706 62.49,45.542 62.561,45.371 62.616,45.195 62.656,45.014 62.68,44.831 62.688,44.646 62.684,44.545 62.686,44.545 62.684,44.521 62.684,0.021 62.686,-0.003 62.684,-0.003 62.688,-0.104 62.68,-0.289 62.656,-0.472 62.616,-0.653 62.561,-0.829 62.49,-1 62.404,-1.164 62.305,-1.32 62.193,-1.466 62.068,-1.603 61.931,-1.728 61.785,-1.84 61.629,-1.94 61.465,-2.025 61.294,-2.096 61.118,-2.151 60.937,-2.191 60.754,-2.215 60.681,-2.219 -0.293,-2.219 -0.366,-2.215 -0.549,-2.191 -0.73,-2.151 -0.906,-2.096 -1.077,-2.025 -1.241,-1.939 -1.397,-1.84 -1.543,-1.728 -1.68,-1.603 -1.805,-1.466 -1.917,-1.32 -2.017,-1.164 -2.102,-1 -2.173,-0.829 -2.228,-0.653 -2.268,-0.472 -2.292,-0.289 -2.3,-0.104 -2.296,-0.003 -2.298,-0.003 -2.296,0.021 -2.296,44.521 -2.298,44.545 -2.296,44.545 -2.3,44.646 -2.292,44.831 -2.268,45.014 -2.228,45.195 -2.173,45.371 -2.102,45.542 -2.016,45.706 -1.917,45.862 -1.805,46.008 -1.68,46.145 -1.543,46.27 -1.397,46.382 -1.241,46.481 -1.077,46.567 -0.906,46.638 -0.73,46.693 -0.549,46.733 -0.366,46.757 -0.293,46.761
no net on Int6 (PWR) (split plane): 60.681,46.761 60.754,46.757 60.937,46.733 61.118,46.693 61.294,46.638 61.465,46.567 61.629,46.481 61.785,46.382 61.931,46.27 62.068,46.145 62.193,46.008 62.305,45.862 62.404,45.706 62.49,45.542 62.561,45.371 62.616,45.195 62.656,45.014 62.68,44.831 62.688,44.646 62.684,44.545 62.686,44.545 62.684,44.521 62.684,0.021 62.686,-0.003 62.684,-0.003 62.688,-0.104 62.68,-0.289 62.656,-0.472 62.616,-0.653 62.561,-0.829 62.49,-1 62.404,-1.164 62.305,-1.32 62.193,-1.466 62.068,-1.603 61.931,-1.728 61.785,-1.84 61.629,-1.94 61.465,-2.025 61.294,-2.096 61.118,-2.151 60.937,-2.191 60.754,-2.215 60.681,-2.219 -0.293,-2.219 -0.366,-2.215 -0.549,-2.191 -0.73,-2.151 -0.906,-2.096 -1.077,-2.025 -1.241,-1.939 -1.397,-1.84 -1.543,-1.728 -1.68,-1.603 -1.805,-1.466 -1.917,-1.32 -2.017,-1.164 -2.102,-1 -2.173,-0.829 -2.228,-0.653 -2.268,-0.472 -2.292,-0.289 -2.3,-0.104 -2.296,-0.003 -2.298,-0.003 -2.296,0.021 -2.296,44.521 -2.298,44.545 -2.296,44.545 -2.3,44.646 -2.292,44.831 -2.268,45.014 -2.228,45.195 -2.173,45.371 -2.102,45.542 -2.016,45.706 -1.917,45.862 -1.805,46.008 -1.68,46.145 -1.543,46.27 -1.397,46.382 -1.241,46.481 -1.077,46.567 -0.906,46.638 -0.73,46.693 -0.549,46.733 -0.366,46.757 -0.293,46.761
no net on GND2 (split plane): 60.681,46.761 60.754,46.757 60.937,46.733 61.118,46.693 61.294,46.638 61.465,46.567 61.629,46.481 61.785,46.382 61.931,46.27 62.068,46.145 62.193,46.008 62.305,45.862 62.404,45.706 62.49,45.542 62.561,45.371 62.616,45.195 62.656,45.014 62.68,44.831 62.688,44.646 62.684,44.545 62.686,44.545 62.684,44.521 62.684,0.021 62.686,-0.003 62.684,-0.003 62.688,-0.104 62.68,-0.289 62.656,-0.472 62.616,-0.653 62.561,-0.829 62.49,-1 62.404,-1.164 62.305,-1.32 62.193,-1.466 62.068,-1.603 61.931,-1.728 61.785,-1.84 61.629,-1.94 61.465,-2.025 61.294,-2.096 61.118,-2.151 60.937,-2.191 60.754,-2.215 60.681,-2.219 -0.293,-2.219 -0.366,-2.215 -0.549,-2.191 -0.73,-2.151 -0.906,-2.096 -1.077,-2.025 -1.241,-1.939 -1.397,-1.84 -1.543,-1.728 -1.68,-1.603 -1.805,-1.466 -1.917,-1.32 -2.017,-1.164 -2.102,-1 -2.173,-0.829 -2.228,-0.653 -2.268,-0.472 -2.292,-0.289 -2.3,-0.104 -2.296,-0.003 -2.298,-0.003 -2.296,0.021 -2.296,44.521 -2.298,44.545 -2.296,44.545 -2.3,44.646 -2.292,44.831 -2.268,45.014 -2.228,45.195 -2.173,45.371 -2.102,45.542 -2.016,45.706 -1.917,45.862 -1.805,46.008 -1.68,46.145 -1.543,46.27 -1.397,46.382 -1.241,46.481 -1.077,46.567 -0.906,46.638 -0.73,46.693 -0.549,46.733 -0.366,46.757 -0.293,46.761
no net on Int9 (PWR) (split plane): 60.681,46.761 60.754,46.757 60.937,46.733 61.118,46.693 61.294,46.638 61.465,46.567 61.629,46.481 61.785,46.382 61.931,46.27 62.068,46.145 62.193,46.008 62.305,45.862 62.404,45.706 62.49,45.542 62.561,45.371 62.616,45.195 62.656,45.014 62.68,44.831 62.688,44.646 62.684,44.545 62.686,44.545 62.684,44.521 62.684,0.021 62.686,-0.003 62.684,-0.003 62.688,-0.104 62.68,-0.289 62.656,-0.472 62.616,-0.653 62.561,-0.829 62.49,-1 62.404,-1.164 62.305,-1.32 62.193,-1.466 62.068,-1.603 61.931,-1.728 61.785,-1.84 61.629,-1.94 61.465,-2.025 61.294,-2.096 61.118,-2.151 60.937,-2.191 60.754,-2.215 60.681,-2.219 -0.293,-2.219 -0.366,-2.215 -0.549,-2.191 -0.73,-2.151 -0.906,-2.096 -1.077,-2.025 -1.241,-1.939 -1.397,-1.84 -1.543,-1.728 -1.68,-1.603 -1.805,-1.466 -1.917,-1.32 -2.017,-1.164 -2.102,-1 -2.173,-0.829 -2.228,-0.653 -2.268,-0.472 -2.292,-0.289 -2.3,-0.104 -2.296,-0.003 -2.298,-0.003 -2.296,0.021 -2.296,44.521 -2.298,44.545 -2.296,44.545 -2.3,44.646 -2.292,44.831 -2.268,45.014 -2.228,45.195 -2.173,45.371 -2.102,45.542 -2.016,45.706 -1.917,45.862 -1.805,46.008 -1.68,46.145 -1.543,46.27 -1.397,46.382 -1.241,46.481 -1.077,46.567 -0.906,46.638 -0.73,46.693 -0.549,46.733 -0.366,46.757 -0.293,46.761
no net on Int10 (GND) (split plane): 60.681,46.761 60.754,46.757 60.937,46.733 61.118,46.693 61.294,46.638 61.465,46.567 61.629,46.481 61.785,46.382 61.931,46.27 62.068,46.145 62.193,46.008 62.305,45.862 62.404,45.706 62.49,45.542 62.561,45.371 62.616,45.195 62.656,45.014 62.68,44.831 62.688,44.646 62.684,44.545 62.686,44.545 62.684,44.521 62.684,0.021 62.686,-0.003 62.684,-0.003 62.688,-0.104 62.68,-0.289 62.656,-0.472 62.616,-0.653 62.561,-0.829 62.49,-1 62.404,-1.164 62.305,-1.32 62.193,-1.466 62.068,-1.603 61.931,-1.728 61.785,-1.84 61.629,-1.94 61.465,-2.025 61.294,-2.096 61.118,-2.151 60.937,-2.191 60.754,-2.215 60.681,-2.219 -0.293,-2.219 -0.366,-2.215 -0.549,-2.191 -0.73,-2.151 -0.906,-2.096 -1.077,-2.025 -1.241,-1.939 -1.397,-1.84 -1.543,-1.728 -1.68,-1.603 -1.805,-1.466 -1.917,-1.32 -2.017,-1.164 -2.102,-1 -2.173,-0.829 -2.228,-0.653 -2.268,-0.472 -2.292,-0.289 -2.3,-0.104 -2.296,-0.003 -2.298,-0.003 -2.296,0.021 -2.296,44.521 -2.298,44.545 -2.296,44.545 -2.3,44.646 -2.292,44.831 -2.268,45.014 -2.228,45.195 -2.173,45.371 -2.102,45.542 -2.016,45.706 -1.917,45.862 -1.805,46.008 -1.68,46.145 -1.543,46.27 -1.397,46.382 -1.241,46.481 -1.077,46.567 -0.906,46.638 -0.73,46.693 -0.549,46.733 -0.366,46.757 -0.293,46.761

## Other copper
Top Layer:
  region: 60.505,-2.651 ccw(c60.625,-0.125) 63.15,-0.246 63.15,1.422 63.141,1.422 ccw(c60.5,0) 59.087,-2.647 59.087,-2.651
  region: 63.151,44.505 ccw(c60.625,44.625) 60.746,47.15 59.078,47.15 59.078,47.141 ccw(c60.5,44.5) 63.147,43.087 63.151,43.087
  region: -0.005,47.151 ccw(c-0.125,44.625) -2.65,44.746 -2.65,43.078 -2.641,43.078 ccw(c0,44.5) 1.413,47.147 1.413,47.151
  region: -2.651,-0.005 ccw(c-0.125,-0.125) -0.246,-2.65 1.422,-2.65 1.422,-2.641 ccw(c0,0) -2.647,1.413 -2.651,1.413
Int3 (Sign):
  region: 60.505,-2.651 ccw(c60.625,-0.125) 63.15,-0.246 63.15,1.422 63.141,1.422 ccw(c60.5,0) 59.087,-2.647 59.087,-2.651
  region: 63.151,44.505 ccw(c60.625,44.625) 60.746,47.15 59.078,47.15 59.078,47.141 ccw(c60.5,44.5) 63.147,43.087 63.151,43.087
  region: -0.005,47.151 ccw(c-0.125,44.625) -2.65,44.746 -2.65,43.078 -2.641,43.078 ccw(c0,44.5) 1.413,47.147 1.413,47.151
  region: -2.651,-0.005 ccw(c-0.125,-0.125) -0.246,-2.65 1.422,-2.65 1.422,-2.641 ccw(c0,0) -2.647,1.413 -2.651,1.413
Int4 (Sign):
  region: 60.505,-2.651 ccw(c60.625,-0.125) 63.15,-0.246 63.15,1.422 63.141,1.422 ccw(c60.5,0) 59.087,-2.647 59.087,-2.651
  region: 63.151,44.505 ccw(c60.625,44.625) 60.746,47.15 59.078,47.15 59.078,47.141 ccw(c60.5,44.5) 63.147,43.087 63.151,43.087
  region: -0.005,47.151 ccw(c-0.125,44.625) -2.65,44.746 -2.65,43.078 -2.641,43.078 ccw(c0,44.5) 1.413,47.147 1.413,47.151
  region: -2.651,-0.005 ccw(c-0.125,-0.125) -0.246,-2.65 1.422,-2.65 1.422,-2.641 ccw(c0,0) -2.647,1.413 -2.651,1.413
Int7 (Sign):
  region: 60.505,-2.651 ccw(c60.625,-0.125) 63.15,-0.246 63.15,1.422 63.141,1.422 ccw(c60.5,0) 59.087,-2.647 59.087,-2.651
  region: 63.151,44.505 ccw(c60.625,44.625) 60.746,47.15 59.078,47.15 59.078,47.141 ccw(c60.5,44.5) 63.147,43.087 63.151,43.087
  region: -0.005,47.151 ccw(c-0.125,44.625) -2.65,44.746 -2.65,43.078 -2.641,43.078 ccw(c0,44.5) 1.413,47.147 1.413,47.151
  region: -2.651,-0.005 ccw(c-0.125,-0.125) -0.246,-2.65 1.422,-2.65 1.422,-2.641 ccw(c0,0) -2.647,1.413 -2.651,1.413
Int8 (Sign):
  region: 60.505,-2.651 ccw(c60.625,-0.125) 63.15,-0.246 63.15,1.422 63.141,1.422 ccw(c60.5,0) 59.087,-2.647 59.087,-2.651
  region: 63.151,44.505 ccw(c60.625,44.625) 60.746,47.15 59.078,47.15 59.078,47.141 ccw(c60.5,44.5) 63.147,43.087 63.151,43.087
  region: -0.005,47.151 ccw(c-0.125,44.625) -2.65,44.746 -2.65,43.078 -2.641,43.078 ccw(c0,44.5) 1.413,47.147 1.413,47.151
  region: -2.651,-0.005 ccw(c-0.125,-0.125) -0.246,-2.65 1.422,-2.65 1.422,-2.641 ccw(c0,0) -2.647,1.413 -2.651,1.413
Bottom Layer:
  region: 60.505,-2.651 ccw(c60.625,-0.125) 63.15,-0.246 63.15,1.422 63.141,1.422 ccw(c60.5,0) 59.087,-2.647 59.087,-2.651
  region: 63.151,44.505 ccw(c60.625,44.625) 60.746,47.15 59.078,47.15 59.078,47.141 ccw(c60.5,44.5) 63.147,43.087 63.151,43.087
  region: -0.005,47.151 ccw(c-0.125,44.625) -2.65,44.746 -2.65,43.078 -2.641,43.078 ccw(c0,44.5) 1.413,47.147 1.413,47.151
  region: -2.651,-0.005 ccw(c-0.125,-0.125) -0.246,-2.65 1.422,-2.65 1.422,-2.641 ccw(c0,0) -2.647,1.413 -2.651,1.413

## Silkscreen, mask and mechanical layers (free items; w line width, h text height)
Mechanical 1:
  lines w0.1: -2.75,0 ccw(c-0.125,-0.125) -0.25,-2.75 ; -2.75,0 -2.75,44.5 ; -2.75,0 -2.75,44.5 ; -2.75,44.5 cw(c-0.125,44.625) -0.25,47.25 ; -2.75,44.5 cw(c-0.125,44.625) -0.25,47.25 ; -0.25,-2.75 60.75,-2.75 ; -0.25,-2.75 60.75,-2.75 ; -0.25,47.25 60.75,47.25 ; -0.25,47.25 60.75,47.25 ; 60.75,-2.75 ccw(c60.625,-0.125) 63.25,0 ; 60.75,-2.75 ccw(c60.625,-0.125) 63.25,0 ; 60.75,47.25 cw(c60.625,44.625) 63.25,44.5 ; 60.75,47.25 cw(c60.625,44.625) 63.25,44.5 ; 63.25,0 63.25,44.5 ; 63.25,0 63.25,44.5
Mechanical 13:
  drawing of 232 lines, arcs and shapes, not listed